# Altium PCB PS_DC-DC_15V_24V.PcbDoc (part 2 of 2)
Units mm, origin at the board's own origin, x right, y up, seen from the top; angles counter-clockwise.
Board outline 210 x 80 mm, 2 copper layers (Top Layer, Bottom Layer), stack 2.071 mm thick; 176 components, 72 nets, 404 pads, 116 vias.
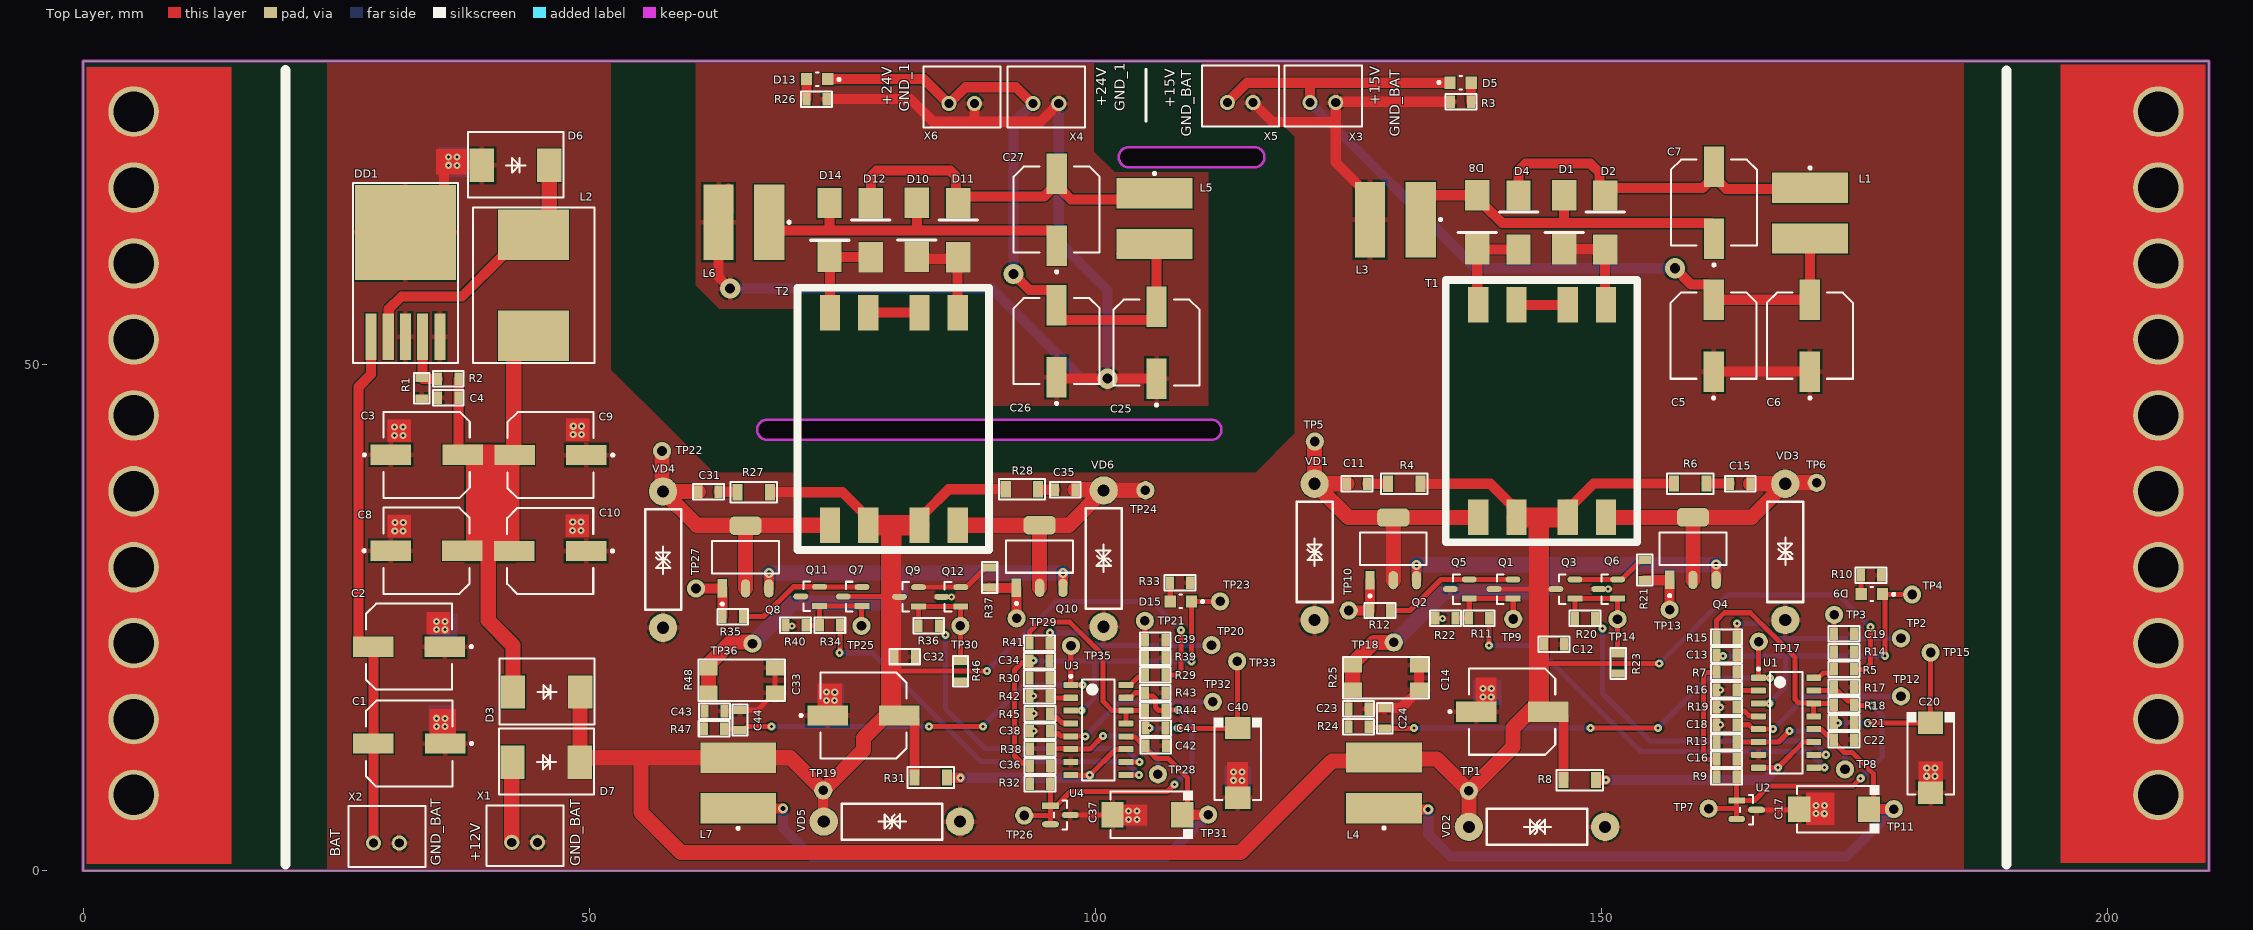
[diagram p0: Top Layer view]

## Silkscreen, mask and mechanical layers (free items; w line width, h text height) (continued)
Bottom Overlay: (continued)
  text "+12V" at 38.254,1.304 h0.8 r270
  text "GND_BAT" at 34.562,1.129 h0.8 r270
  text "GND_BAT" at 48.171,0.604 h1 r270